# Altium PCB BYKC-6252-K20-C.PcbDoc
Units mm, origin at the board's own origin, x right, y up, seen from the top; angles counter-clockwise.
Board outline 75 x 26.5 mm, 2 copper layers (Top Layer, Bottom Layer); 62 components, 71 nets, 246 pads, 176 vias.
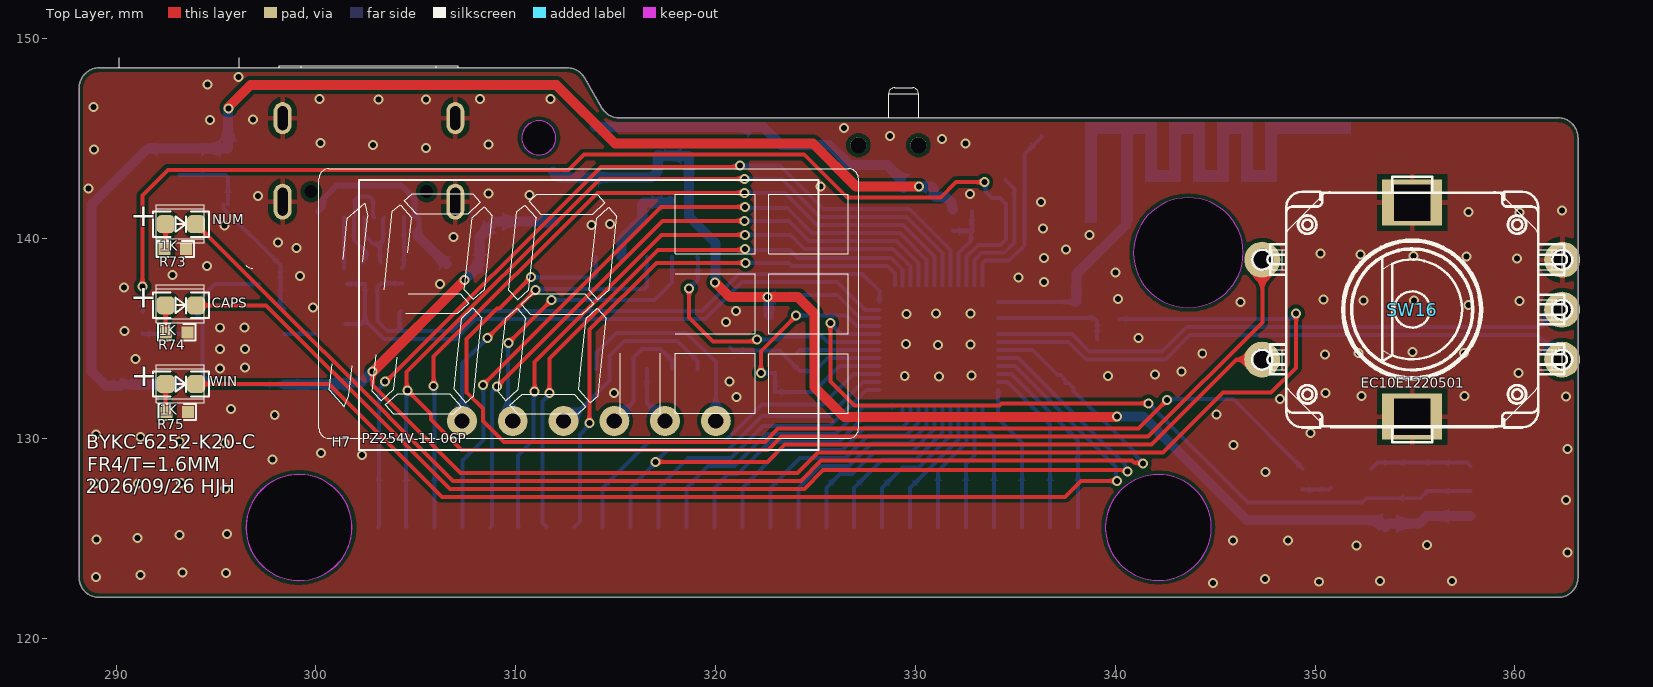
[diagram p0: Top Layer view]
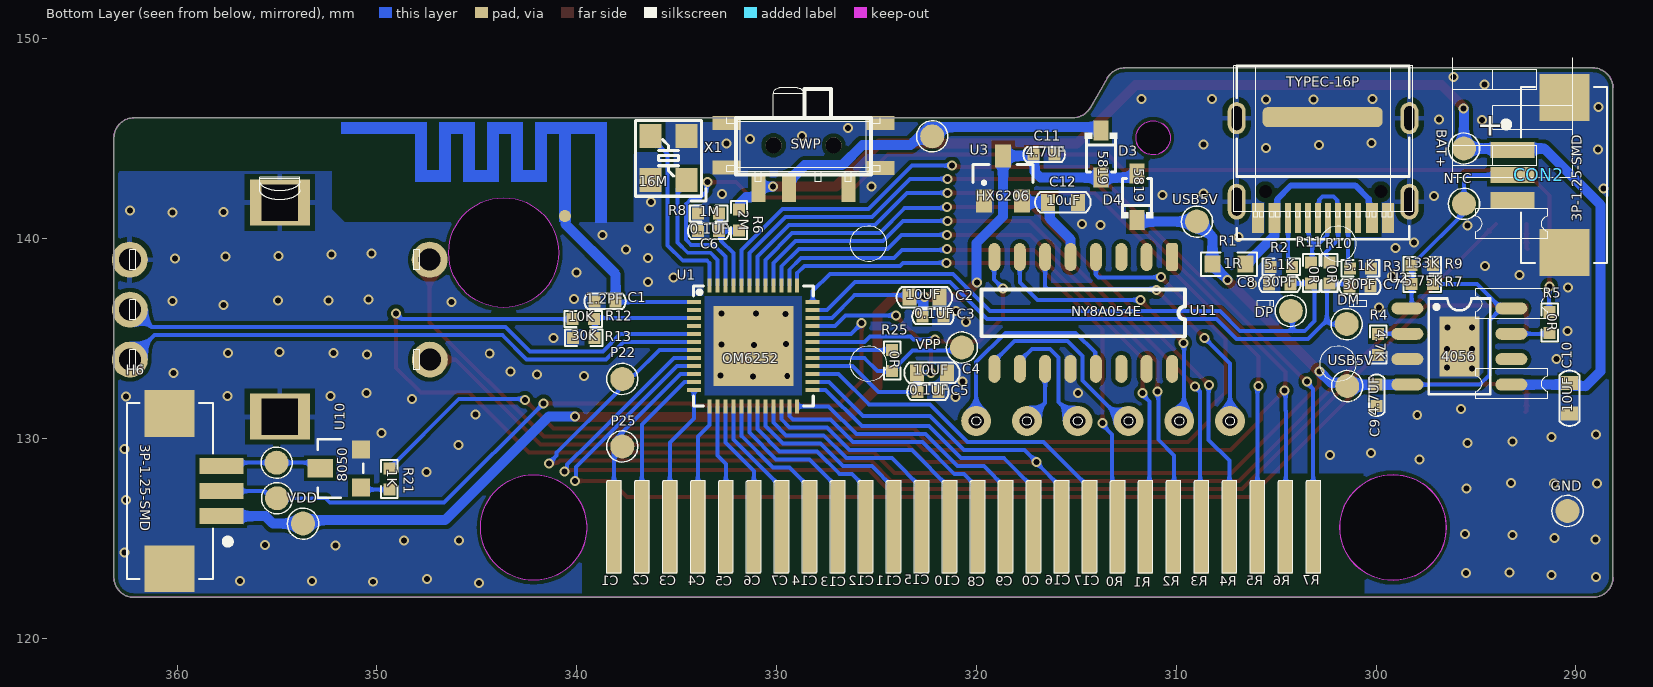
[diagram p1: Bottom Layer view, seen from below]
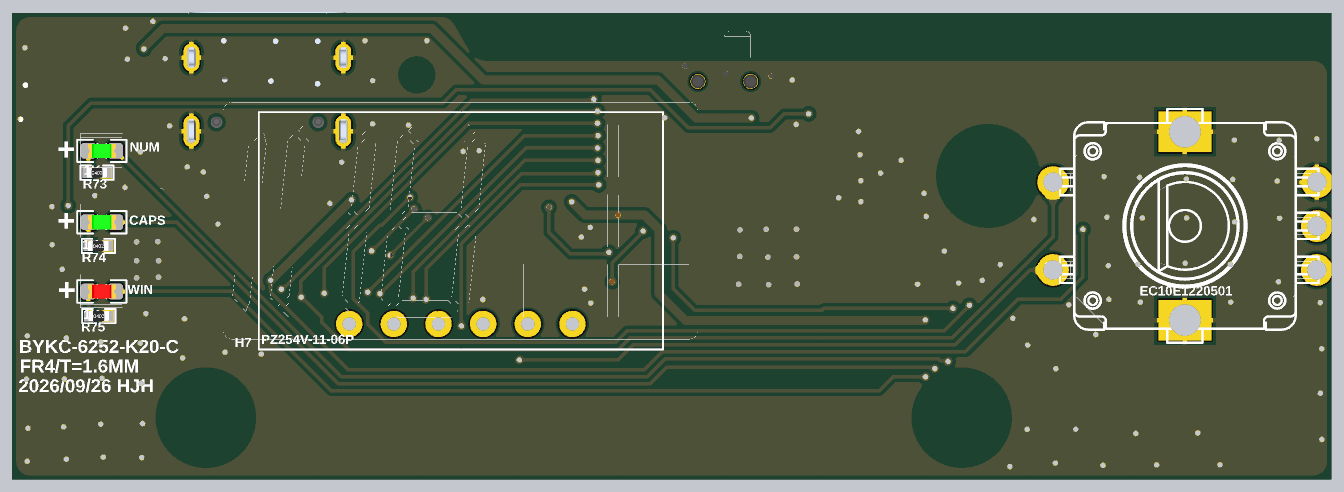
[diagram p2: 3D render of the assembled board from above, using the file's embedded part models]
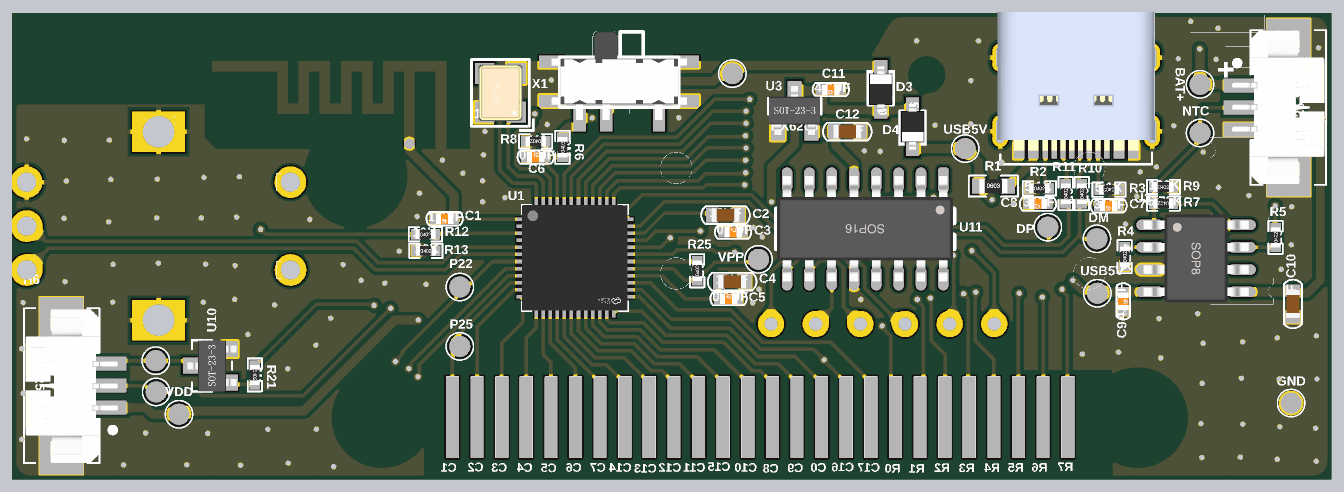
[diagram p3: 3D render of the assembled board from below, using the file's embedded part models]

## Layer stack, top to bottom
Top Solder: solder mask 0.0102, Solder Resist, Dk 3.5
Top Layer: signal copper 0.0356
Dielectric 1: dielectric 0.32, FR-4, Dk 4.8
Bottom Layer: signal copper 0.0356
Bottom Solder: solder mask 0.0102, Solder Resist, Dk 3.5

## Board outline
288.155,123.036 288.155,147.536 cw(c289.155,147.536) 289.155,148.536 312.578,148.536 cw(c312.578,147.536) 313.444,148.036 314.309,146.536 ccw(c315.175,147.036) 315.175,146.036 362.156,146.036 cw(c362.156,145.036) 363.156,145.036 363.155,123.036 cw(c362.155,123.036) 362.155,122.036 289.155,122.036 cw(c289.155,123.036)
cut-out: 296.498,125.536 ccw(c299.155,125.536) 299.155,122.88 ccw(c299.155,125.536) 301.034,123.658 ccw(c299.155,125.536) 301.812,125.536 ccw(c299.155,125.536) 299.155,128.193 ccw(c299.155,125.536) 297.276,127.415 ccw(c299.155,125.536)
cut-out: 339.505,125.536 ccw(c342.155,125.536) 342.155,122.886 ccw(c342.155,125.536) 344.805,125.536 ccw(c342.155,125.536) 342.155,128.186 ccw(c342.155,125.536)
cut-out: 340.905,139.286 ccw(c343.655,139.286) 343.655,136.536 ccw(c343.655,139.286) 346.405,139.286 ccw(c343.655,139.286) 343.655,142.036 ccw(c343.655,139.286)
cut-out: 310.298,145.036 ccw(c311.155,145.036) 311.155,144.179 ccw(c311.155,145.036) 312.012,145.036 ccw(c311.155,145.036) 311.155,145.893 ccw(c311.155,145.036)

## Design rules (kind name [scope] priority, off if disabled: settings)
Clearance [All] p1: gap=0.2 ignorepadtopadclearanceinfootprint=TRUE
ComponentClearance [All] p1: gap=0 collisioncheckmode=3 verticalgap=0 showdistances=FALSE
HoleToHoleClearance [All] p1: gap=0 allowstackedmicrovias=TRUE
MinimumSolderMaskSliver [All] p1: minsoldermaskwidth=0
PolygonConnect [All] p1: thpad.connectstyle=Relief thpad.reliefconductorwidth=0.254 thpad.reliefentries=4 thpad.polygonreliefangle="90 Angle" thpad.airgapwidth=0.254 smdpad.connectstyle=Direct smdpad.reliefconductorwidth=0.254 smdpad.reliefentries=4 smdpad.polygonreliefangle="90 Angle" smdpad.airgapwidth=0.254 via.connectstyle=Direct via.reliefconductorwidth=0.254 via.reliefentries=4 via.polygonreliefangle="90 Angle" via.airgapwidth=0.254
RoutingVias [All] p1: holewidth=0.3 width=0.5 viastyle="Through Hole" minholewidth=0.3 minwidth=0.5 maxholewidth=0.5 maxwidth=0.7
SilkToSilkClearance [All] p1: silktosilkclearance=0
SilkToSolderMaskClearance [IsPad] p1: minsilkscreentomaskgap=0 clearancetoexposedcopper=TRUE
SolderMaskExpansion [All] p1: expansion=0.102 istentingtop=FALSE
Width [All] p1: maxlimit=0.5 minlimit=0.2 preferedwidth=0.2
25 further rules are at their usual default settings.

## Classes and differential pairs
component class k20-b-2-3: C1 C2 C3 C4 C5 C6 C7 C8 C9 C10 C11 C12 CAPS CON2 D3 D4 H6 H7 NUM R1 R2 R3 R4 R5 R6 R7 R8 R9 R10 R11 R12 R13 R21 R25 R73 R74 R75 SW16 SWP

## Components (designator, comment, footprint, x,y, rotation, side; value= is the part's Value field where it differs from the comment)
BAT+ "" TEST 295.605,144.501 r90 bottom (schematic designator VPP)
C1 "1.2PF" C0402 338.582,136.855 r0 bottom
C2 "10UF" C0603 322.601,137.058 r0 bottom
C3 "0.1UF" C0402 322.174,136.093 r180 bottom
C4 "10UF" C0603 322.224,133.274 r0 bottom
C5 "0.1UF" C0402 322.428,132.309 r180 bottom
C6 "0.1UF" C0402 333.4,140.36 r180 bottom
C7 "30PF" C0402 300.812,137.592 r0 bottom
C8 "30PF" C0402 304.825,137.693 r0 bottom
C9 "4.7UF" C0402 299.974,132.153 r270 bottom
C10 "10UF" C0603 290.322,132.004 r90 bottom
C11 "4.7UF" C0402 316.611,144.196 r0 bottom
C12 "10uF" C0603 315.671,141.808 r0 bottom
CAPS "" LED_0603G 293.243,136.652 r0 top
CON2 "3P-1.25-SMD" 3P_1.25W_SMD 293.167,144.43 r90 bottom
D3 "5819" SOD-323(5819) 313.766,144.221 r270 bottom
D4 "5819" SOD-323(5819) 311.963,142.088 r90 bottom
DM "" TEST 301.473,135.712 r180 bottom
DP "" TEST 304.267,136.373 r180 bottom
GND "" TEST 290.424,126.365 r90 bottom
H6 "3P-1.25-SMD" 3P_1.25W_SMD 357.784,126.106 r270 bottom
H7 "PZ254V-11-06P" SMG-6P 313.407,133.819 r0 top locked
NTC "" TEST 295.605,141.732 r90 bottom (schematic designator VPP)
NUM "" LED_0603G 293.243,140.716 r0 top
P22 "" TEST 337.718,132.969 r90 bottom
P25 "" TEST 337.718,129.591 r90 bottom
R1 "1R" R0603 307.365,138.709 r180 bottom
R2 "5.1K" R0402 304.749,138.582 r180 bottom
R3 "5.1K" R0402 300.787,138.506 r0 bottom
R4 "4.7K" R0402 299.898,134.696 r90 bottom
R5 "0R" R0402 291.313,135.792 r90 bottom
R6 "2M" R0402 331.876,140.919 r90 bottom
R7 "5.75K" R0402 297.688,137.719 r0 bottom value=5.76K
R8 "1M" R0402 333.4,141.249 r0 bottom
R9 "133K" R0402 297.688,138.659 r180 bottom
R10 "0R" R0402 302.336,138.278 r90 bottom
R11 "0R" R0402 303.251,138.278 r90 bottom
R12 "10K" R0402 339.674,135.966 r180 bottom
R13 "30K" R0402 339.649,135.026 r180 bottom
R21 "1K" R0402 349.377,127.965 r270 bottom
R25 "0R" R0402 324.212,133.89 r90 bottom
R73 "1K" R0402 292.964,139.471 r0 top
R74 "1K" R0402 293.04,135.306 r0 top
R75 "1K" R0402 293.065,131.318 r0 top
SW16 "EC10E1220501" EC11 354.856,136.437 r90 top locked
SWP "" SW_SMD_7 328.65,144.661 r0 bottom locked
TYPEC-16P "Comment" TYPE_C_16 298.337,141.84 r180 bottom
U1 "OM6252" QFN48_6*6 331.165,134.62 r180 bottom
U2 "4056" SOP_8_D 295.834,134.595 r180 bottom
U3 "HX6206" SOT_23 318.668,143.002 r180 bottom
U10 "8050" SOT_23_NPN 351.815,128.486 r90 bottom
U11 "NY8A054E" SOP16 314.655,136.271 r270 bottom locked
USB5V "" TEST 301.447,132.613 r90 bottom (schematic designator VPP)
USB5V "" TEST 308.966,140.843 r90 bottom (schematic designator VPP)
VDD "" TEST 353.695,125.73 r90 bottom (schematic designator VBAT)
VPP "" TEST 322.212,145.109 r90 bottom
VPP "" TEST 354.99,127 r90 bottom
VPP "" TEST 355.016,128.778 r90 bottom
VPP "" TEST 320.726,134.544 r90 bottom
WIN "" LED_0603R 293.243,132.715 r0 top
X1 "16M" CRYSTAL-SMD3225-4P 335.407,144.018 r90 bottom
? "" ANT_F_S 340.589,141.122 r90 bottom

## Footprints (in the part's own frame and the unit in brackets; to place one, negate y for a bottom-side part, rotate by r counter-clockwise, add the part's x,y. Pads: shape width x height; smd on the part's side, far side on the other; paste and mask are expansions set on the pad)
3P_1.25W_SMD [mm]
  rect 0.8x2.2 smd paste+0 mask+0.05: 1(0,0) 2(-1.25,0) 3(-2.5,0)
  rect 2.35x2.5 smd paste+0 mask+0.05: 4(-5.134,-2.6) 5(2.634,-2.6)
  silkscreen extent -5.65,-4.73 3.15,0.48, body extent -5.6,-4.63 3.15,0.62, height 5
ANT_F_S [mm]
  round 0.6 smd: 1(0,0)
  Top Layer region: 4.7,11.212 4.7,6.9 4.1,6.9 4.1,11.212
  Top Layer region: 4.699,6.9 1.699,6.9 1.699,7.5 4.699,7.5
  Top Layer region: 1.7,5.701 1.7,7.192 2.299,7.192 2.299,5.701
  Top Layer region: 4.7,6.301 4.7,4.801 4.1,4.801 4.1,6.301
  Top Layer region: 1.7,6.299 4.7,6.299 4.7,5.699 1.7,5.699
  Top Layer region: 4.7,4.499 1.7,4.499 1.7,5.099 4.7,5.099
  Top Layer region: 1.7,3.609 1.7,5.101 2.299,5.101 2.299,3.609
  Top Layer region: 4.7,3.901 4.7,2.401 4.1,2.401 4.1,3.901
  Top Layer region: 1.7,1.5 4.7,1.5 4.7,0.9 1.7,0.9
  Top Layer region: -0.3,0.3 4.7,0.3 4.7,-0.3 -0.3,-0.3
  Top Layer region: 4.101,-1.715 4.101,-0.009 4.7,-0.009 4.7,-1.715
  Top Layer region: 4.7,-2.1 -0.362,-2.1 -0.362,-1.5 4.7,-1.5
  Top Layer region: 1.7,3.899 4.7,3.899 4.7,3.299 1.7,3.299
  Top Layer region: 4.7,2.1 1.7,2.1 1.7,2.7 4.7,2.7
  Top Layer region: 2.3,2.392 2.3,0.9 1.701,0.9 1.701,2.392
  Top Layer region: 4.7,1.499 4.7,-0.001 4.1,-0.001 4.1,1.499
C0402 [mm]
  rect 0.6x0.6 smd mask+0.03: 1(-0.53,0) 2(0.53,0)
  silkscreen extent -1.04,-0.38 1.04,0.38, body extent -0.5,-0.3 0.5,0.3, height 0.2
C0603 [mm]
  rect 0.7x0.85 smd paste+0 mask+0.051: 1(0.753,0) 2(-0.753,0)
  silkscreen extent -1.39,-0.51 1.39,0.51, body extent -0.8,-0.4 0.8,0.4, height 0.8
CRYSTAL-SMD3225-4P [mm]
  rect 1.2x1.1 smd: 0(-1.1,0.9) 0(1.1,-0.9) 1(1.1,0.9) 2(-1.1,-0.9)
  silkscreen extent -2.14,-1.87 1.89,1.64, body extent -1.6,-1.25 1.6,1.25, height 0.7
EC11 [mm]
  round 1.8 hole 1.1: 1(-2.499,-7.501) 2(-0.002,-7.501) 3(2.499,-7.508) 4(2.499,7.501) 5(-2.499,7.508)
  rect 2.3x3 hole 1.8 square: 6(5.36,0) 7(-5.35,0)
  silkscreen extent -6.64,-8.01 6.66,8.01
LED_0603G [mm]
  rrect50% 0.9x0.9 smd: 1(-0.762,0) 2(0.762,0)
  silkscreen extent -1.4,-0.64 1.4,0.64, body extent -0.8,-0.4 0.8,0.4, height 0.8
LED_0603R [mm]
  rrect50% 0.9x0.9 smd: 1(-0.762,0) 2(0.762,0)
  silkscreen extent -1.4,-0.64 1.4,0.64, body extent -0.8,-0.4 0.8,0.4, height 0.8
QFN48_6*6 [mm]
  rect 0.7x0.2 smd: 1(-2.975,2.2) 2(-2.975,1.8) 3(-2.975,1.4) 4(-2.975,1) 5(-2.975,0.6) 6(-2.975,0.2) 7(-2.975,-0.2) 8(-2.975,-0.6) 9(-2.975,-1) 10(-2.975,-1.4) 11(-2.975,-1.8) 12(-2.975,-2.2) 25(2.975,-2.2) 26(2.975,-1.8) 27(2.975,-1.4) 28(2.975,-1) 29(2.975,-0.6) 30(2.975,-0.2) 31(2.975,0.2) 32(2.975,0.6) 33(2.975,1) 34(2.975,1.4) 35(2.975,1.8) 36(2.975,2.2)
  rect 0.2x0.7 smd: 13(-2.2,-3.025) 14(-1.8,-3.025) 15(-1.4,-3.025) 16(-1,-3.025) 17(-0.6,-3.025) 18(-0.2,-3.025) 19(0.2,-3.025) 20(0.6,-3.025) 21(1,-3.025) 22(1.4,-3.025) 23(1.8,-3.025) 24(2.2,-3.025) 37(2.2,3.025) 38(1.8,3.025) 39(1.4,3.025) 40(1,3.025) 41(0.6,3.025) 42(0.2,3.025) 43(-0.2,3.025) 44(-0.6,3.025) 45(-1,3.025) 46(-1.4,3.025) 47(-1.8,3.025) 48(-2.2,3.025)
  rect 4x4 smd: 49(0,0)
  silkscreen extent -3,-3 3,3, body extent -3,-3 3,3, height 0.5
R0402 [mm]
  rect 0.6x0.6 smd mask+0.03: 1(-0.53,0) 2(0.53,0)
  silkscreen extent -0.94,-0.41 0.94,0.41, body extent -0.57,-0.28 0.57,0.28, height 0.41
R0603 [mm]
  rect 0.8x0.85 smd: 1(-0.825,0) 2(0.825,0)
  silkscreen extent -1.4,-0.6 1.4,0.6, body extent -0.8,-0.41 0.8,0.41, height 0.45
SMG-6P [mm]
  round 1.5 hole 0.762: 1(6.605,-2.953) 2(4.065,-2.953) 3(1.525,-2.953) 4(-1.015,-2.953) 5(-3.555,-2.953) 6(-6.095,-2.953)
  silkscreen extent -11.25,-4.4 11.75,9.1
SOD-323(5819) [mm]
  rect 1x0.75 smd: 1(1.173,0) 2(-1.173,0)
  silkscreen extent -1.08,-0.8 0.9,0.8, body extent -1.3,-0.67 1.3,0.67, height 1.1
SOP16 [mm]
  rrect50% 1.4x0.6 smd: 1(-2.8,4.445)
  oval 1.4x0.6 smd: 2(-2.8,3.175) 3(-2.8,1.905) 4(-2.8,0.635) 5(-2.8,-0.635) 6(-2.8,-1.905) 7(-2.8,-3.175) 8(-2.8,-4.445) 9(2.8,-4.445) 10(2.8,-3.175) 11(2.8,-1.905) 12(2.8,-0.635) 13(2.8,0.635) 14(2.8,1.905) 15(2.8,3.175) 16(2.8,4.445)
  silkscreen extent -1.16,-5.08 1.16,5.08, body extent -3.01,-5.01 2.99,4.99, height 1.9
SOP_8_D [mm]
  rect 2x3 smd: 0(0,0)
  oval 1.6x0.6 smd: 1(-2.6,1.905) 2(-2.6,0.635) 3(-2.6,-0.635) 4(-2.6,-1.905) 5(2.6,-1.905) 6(2.6,-0.635) 7(2.6,0.635) 8(2.6,1.905)
  silkscreen extent -1.53,-2.4 1.54,2.4, body extent -3,-2.5 3,2.5, height 1.9
SOT_23 [mm]
  rect 0.8x1.15 smd: 1(-0.95,-1.125) 2(0.95,-1.125) 3(0,1.125)
  silkscreen extent -1.5,-0.3 1.5,0.7, body extent -1.45,-1.4 1.45,1.4, height 1.2
SOT_23_NPN [mil]
  rect 36x36 smd: 1(-37.5,-40) 2(37.5,-40)
  rect 36x50 smd: 3(0.5,40)
  silkscreen extent -57,-45 57,45, body extent -57,-55 57,55, height 47
SW_SMD_7 [mm]
  rect 1.4x0.7 smd: 0(-3.84,1.125) 0(-3.84,-1.125) 0(3.85,1.12) 0(3.86,-1.125)
  rect 0.7x1.4 smd: 1(2.25,2.145) 2(0.74,2.145) 3(-2.26,2.145)
  round 0.8 hole 0.8: ""(-1.5,0) ""(1.5,0)
  silkscreen extent -3.38,-2.81 3.39,1.46, body extent -3.85,-2.8 3.85,2.2, height 1.16
TEST [mm]
  round 1.2 smd: 1(0,0)
  silkscreen extent -0.78,-0.78 0.78,0.78
TYPE_C_16 [mm] "TYPE-C 16PIN 2MD"
  round 0.025 hole 0.65 unplated: 5(-1.43,0.5) 6(-7.21,0.5)
  rect 0.6x1.5 smd: A1/B12(-1.067,-0.824) A4/B9(-1.88,-0.824) B1/A12(-7.569,-0.824) B4/A9(-6.756,-0.824)
  rect 0.3x1.5 smd: A5(-3.07,-0.824) A6(-4.07,-0.824) A7(-4.57,-0.824) A8(-5.57,-0.824) B5(-6.07,-0.824) B6(-5.07,-0.824) B7(-3.57,-0.824) B8(-2.57,-0.824)
  oval 0.9x1.6 hole 0.5 slot 1.2 at 90 deg: G(-8.64,4.18) G(0,4.18)
  oval 0.9x1.8 hole 0.5 slot 1.4 at 90 deg: G(-8.64,0) G(0,0)
  rrect50% 6x1 smd: G(-4.343,4.231)
  silkscreen extent -8.64,-1.89 0,6.8, body extent -8.79,-1.12 0.15,6.78, height 3.11

## Part data
BAT+ DM DP GND NTC P22 P25 USB5V USB5V VDD VPP VPP VPP VPP: library part TEST_POINT
C1 C2 C3 C4 C5 C6 C7 C8 C9 C10 C11: library part Cap, "Capacitor", LatestRevisionDate=17-Jul-2002, LatestRevisionNote="Re-released for DXP Platform.", PackageDescription="Radial Cap, Thru-Hole; 2 Leads; 0.3 in Pin Spacing", PackageReference=RAD-0.3, Published=8-Jun-2000, Publisher="Altium Limited"
C12: library part CAPACITOR, "Capacitor"
CAPS NUM WIN: library part LED_0603-R, Add into BOM=yes, Convert to PCB=yes, Device=LED_0603-R, Supplier Footprint=0603, Symbol=LED_R
CON2: library part 3P
D3 D4: library part D_1N4007A, Add into BOM=yes, Convert to PCB=yes, Device=D_1N4007A, Supplier Footprint=DO-41, Symbol=D_1N4007
H6: library part PZ254V-11-03P, Color=黑色, Current Rating (Max)=3A, JLCPCB Part Class="Extended Part", LCSC Part Name="间距:2.54mm 1x3P 直插 方针", Manufacturer=XFCN(兴飞), Operating Temperature Range=-40℃~+105℃, Voltage Rating (Max)=250V, Add into BOM=yes, Circluar Pins/Square Pins=方针, Convert to PCB=yes, Datasheet=https://atta.szlcsc.com/upload/public/pdf/source/20200309/C492402_8335C3D49C4E4C618838D59BB1D024C1.pdf, Device=PZ254V-11-03P, Insulation Height=2.5mm, Length of End Connection Pin=3mm, Length of Mating Pin=6mm, Manufacturer Part=PZ254V-11-03P, Mounting Type=直插, Number of Pins=3P, Number of Rows=单排, Pin Structure=1x3P, Pitch=2.54mm, Row Spacing=-, Supplier=LCSC, Supplier Footprint=插件,P=2.54mm, Supplier Part=C2937625, Symbol=PZ254V-11-03P_C2937625
H7: Color=黑色, Current Rating (Max)=-, JLCPCB Part Class="Extended Part", LCSC Part Name="间距:2.54mm 1x6P 直插 方针", Manufacturer=XFCN(兴飞), Operating Temperature Range=-40℃~+105℃, Add into BOM=yes, Circluar Pins/Square Pins=方针, Contact Material=黄铜, Contact Plating=-, Convert to PCB=yes, Datasheet=https://atta.szlcsc.com/upload/public/pdf/source/20200309/C492405_597F1930F5B55CC3C7FD95458F1C3977.pdf, Device=PZ254V-11-06P, Insulation Height=2.5mm, Length of End Connection Pin=3mm, Length of Mating Pin=6mm, Manufacturer Part=PZ254V-11-06P, Mounting Type=直插, Number of Pins=6P, Number of Rows=单排, Pin Structure=1x6P, Pitch=2.54mm, Row Spacing=-, Supplier=LCSC, Supplier Footprint=插件,P=2.54mm, Supplier Part=C492405, Symbol=PZ254V-11-06P, Voltage Rating (Max)=-
R1 R2 R3 R4 R5 R6 R7 R8 R9 R10 R11 R12 R13 R25: library part Res2, "Resistor", LatestRevisionDate=17-Jul-2002, LatestRevisionNote="Re-released for DXP Platform.", PackageDescription="Axial Device, Thru-Hole; 2 Leads; 0.4 in Pin Spacing", PackageReference=AXIAL-0.4, Published=8-Jun-2000, Publisher="Altium Limited"
R21 R73 R74 R75: library part Res_0603, Add into BOM=yes, Convert to PCB=yes, Device=Res_0603, Supplier Footprint=0603, Symbol=电阻
SW16: JLCPCB Part Class="Extended Part", Manufacturer=ALPSALPINE(阿尔卑斯阿尔派), Add into BOM=yes, Convert to PCB=yes, Datasheet=https://atta.szlcsc.com/upload/public/pdf/source/20180227/C160889_15197014267581370273.pdf, Device=EC10E1220501, LCSC Part Name=EC10E1220501, Manufacturer Part=EC10E1220501, Supplier=LCSC, Supplier Footprint=插件, Supplier Part=C160889, Symbol=EC10E1220501
SWP: library part SW-SPST, "Single-Pole, Single-Throw Switch", LatestRevisionDate=17-Jul-2002, LatestRevisionNote="Re-released for DXP Platform.", PackageDescription="Switch; 2 Leads", PackageReference=SPST-2, Published=24-Mar-1999, Publisher="Altium Limited"
U1: library part QFN48-BYC6625
U2: library part "4057 SOP-8"
U3: library part BL8530
U10: library part SI2301-ZE, Continuous Drain Current (Id)=2.3A, Drain Source On Resistance (RDS(on)@Vgs,Id)=126mΩ@4.5V, Drain Source Voltage (Vdss)=20V, Gate Threshold Voltage (Vgs(th)@Id)=1V@250uA, Input Capacitance (Ciss@Vds)=285pF, JLCPCB Part Class="Extended Part", LCSC Part Name="1个P沟道 耐压:20V 电流:2.3A", Manufacturer="HXY MOSFET(华轩阳电子)", Manufacturer Part=SI2300-ZE, Power Dissipation (Pd)=700mW, Add into BOM=yes, Convert to PCB=yes, Datasheet=https://atta.szlcsc.com/upload/public/pdf/source/20230515/2FF2907841563ED329594D3237822724.pdf, Device=SI2301-ZE, Supplier=LCSC, Supplier Footprint=SOT-23, Supplier Part=C5261052, Symbol=SI2301-ZE, Type=1个P沟道
U11: library part NY8A054E_C5143691, JLCPCB Part Class="Extended Part", Manufacturer=九齐, Add into BOM=yes, Convert to PCB=yes, Datasheet=https://atta.szlcsc.com/upload/public/pdf/source/20220901/9859F0BC82D614E1FA05D663ED00CF5E.pdf, Device=NY8A054E_C5143691, LCSC Part Name=NY8A054E, Manufacturer Part=NY8A054E, Supplier=LCSC, Supplier Footprint=SOP-16, Supplier Part=C5143691, Symbol=NY8A054E_C5143691
X1: library part XTAL, "Crystal Oscillator", LatestRevisionDate=17-Jul-2002, LatestRevisionNote="Re-released for DXP Platform.", PackageDescription="Crystal, Thru-Hole; 2 Leads; Body 3.1 x 8.2 mm (Dia.xH)", PackageReference=R38, Published=8-Jun-2000, Publisher="Altium Limited"
?: library part Antenna, "Generic Antenna", LatestRevisionDate=17-Jul-2002, LatestRevisionNote="Re-released for DXP Platform.", PackageReference=PIN1, Published=24-Mar-1999, Publisher="Altium Limited"

## Free pads (board coordinates)
  rect 0.74x4.65 smd far side: 26(303.138,125.566) 27(304.538,125.566) 28(305.938,125.566) 29(307.338,125.566) 30(308.738,125.566) 31(310.138,125.566) 32(311.538,125.566) 33(312.938,125.566) 34(314.338,125.566) 35(315.738,125.566) 36(317.138,125.566) 37(318.538,125.566) 38(319.938,125.566) 39(321.338,125.566) 40(322.738,125.566) 41(324.138,125.566) 42(325.538,125.566) 43(326.938,125.566) 44(328.338,125.566) 45(329.738,125.566) 46(331.138,125.566) 47(332.538,125.566) 48(333.938,125.566) 49(335.338,125.566) 50(336.738,125.566) 51(338.138,125.566)

## Via types
v1: diameter 0.5, hole 0.3, Top Layer to Bottom Layer, tented both sides, 176 vias

## Nets (pads, with @x,y where several pads share a name; then routed paths per layer and width w, separated by ;. In a path a pad name is that pad's centre, name@x,y a point inside that pad or via, vN(x,y) a via of type N, cw(c..) or ccw(c..) an arc to the next point about the centre after c; other vN are vias at no path point)
54E_CTRL: U1.31 U11.8 | length 13.4
  Top Layer w0.2: v1(318.676,137.502) 318.676,136.054 319.881,134.849 321.905,134.849 322,134.943 v1(322.081,134.943)
  Bottom Layer w0.2: v1(318.676,137.502) 319.113,137.94 319.113,139.058 U11.8 ; v1(322.081,134.943) 323.143,134.943 323.293,135.093 325.333,135.093 325.606,134.82 U1.31
BAT+: BAT+.1 C10.1 CON2.1 R6.2 SWP.1 U2.5 | length 62.9
  Top Layer w0.5: v1(295.631,146.507) 295.631,146.582 296.724,147.676 312.03,147.676 314.962,144.744 324.877,144.744 327.034,142.587 v1(330.19,142.587)
  Bottom Layer w0.5: U2.5 290.39,132.69 C10.1 290.178,132.613 289.509,132.613 288.773,133.35 288.773,141.681 291.592,144.501 293.167,144.501 BAT+.1 295.605,146.482 v1(295.631,146.507) ; v1(330.19,142.587) 330.83,142.587 SWP.1 330.9,142.166 331,142.066 331.533,142.066 331.826,141.774 331.826,141.499 R6.2
C0: pad.36 U1.25 | length 15
  Bottom Layer w0.2: pad.36 317.138,127.521 318.632,129.016 320.778,129.016 322.375,130.613 325.733,130.613 327.54,132.42 U1.25
C1: P25.1 pad.51 U1.10 | length 9.7
  Bottom Layer w0.2: U1.10 334.812,133.22 338.138,129.894 pad.51
C2: pad.50 U1.11 | length 8.6
  Bottom Layer w0.2: U1.11 334.614,132.82 336.738,130.697 pad.50
C3: pad.49 U1.12 | length 7.3
  Bottom Layer w0.2: U1.12 334.14,130.985 335.338,129.787 pad.49
C4: pad.48 U1.13 | length 6.3
  Bottom Layer w0.2: U1.13 333.365,130.667 333.938,130.095 pad.48
C5: pad.47 U1.14 | length 6.2
  Bottom Layer w0.2: pad.47 332.538,128.703 332.965,129.13 U1.14
C6: pad.46 U1.15 | length 6.6
  Bottom Layer w0.2: pad.46 331.138,128.356 332.565,129.783 U1.15
C7: pad.45 U1.16 | length 7
  Bottom Layer w0.2: pad.45 329.738,127.521 332.165,129.949 U1.16
C8: pad.38 U1.23 | length 13.3
  Bottom Layer w0.2: pad.38 319.938,127.521 320.632,128.216 321.109,128.216 322.707,129.813 326.176,129.813 327.308,130.945 329.189,130.945 329.365,131.121 U1.23
C9: pad.37 U1.24 | length 14.1
  Bottom Layer w0.2: pad.37 318.538,127.521 319.632,128.616 320.943,128.616 322.541,130.213 326.01,130.213 327.392,131.595 U1.24
C10: pad.39 U1.22 | length 12.4
  Bottom Layer w0.2: pad.39 321.338,127.521 323.23,129.413 326.342,129.413 327.473,130.545 329.355,130.545 329.765,130.955 U1.22
C11: pad.41 U1.20 | length 10.6
  Bottom Layer w0.2: pad.41 324.138,127.521 325.23,128.613 326.673,128.613 327.805,129.745 329.687,129.745 330.565,130.624 330.565,131.121 U1.20
C12: pad.42 U1.19 | length 9.7
  Bottom Layer w0.2: pad.42 325.538,127.521 326.23,128.213 326.839,128.213 327.97,129.345 329.852,129.345 330.965,130.458 U1.19
C13: pad.43 U1.18 | length 8.8
  Bottom Layer w0.2: pad.43 326.938,127.521 328.361,128.945 330.018,128.945 331.365,130.292 U1.18
C14: pad.44 U1.17 | length 7.9
  Bottom Layer w0.2: pad.44 328.338,127.521 329.361,128.545 330.184,128.545 331.765,130.127 U1.17
C15: pad.40 U1.21 | length 11.5
  Bottom Layer w0.2: pad.40 322.738,127.521 324.23,129.013 326.507,129.013 327.639,130.145 329.521,130.145 330.165,130.789 330.165,131.486 U1.21
C16: pad.35 SW16.5 U1.26 | length 49.1
  Top Layer w0.2: v1(316.992,128.824) 322.605,128.824 323.461,129.68 341.802,129.68 346.06,133.938 SW16.5
  Bottom Layer w0.2: pad.35 315.738,127.521 316.992,128.776 v1(316.992,128.824) ; v1@316.992,128.803 v1(316.992,128.824) ; U1.26 327.375,132.82 325.679,131.124 322.321,131.124 320.612,129.416 317.584,129.416 v1(316.992,128.824)
C17: pad.34 U1.27 | length 18.2
  Bottom Layer w0.2: pad.34 314.338,127.521 316.632,129.816 320.446,129.816 321.327,130.697 322.314,131.683 325.363,131.683 326.9,133.22 U1.27
CHR_OK: R5.2 U1.46 | length 57.4
  Top Layer w0.2: v1@291.327,137.603 291.327,142.153 292.608,143.434 312.649,143.434 313.408,144.194 324.436,144.194 326.593,142.037 331.256,142.037 332.037,142.818 v1(333.451,142.818)
  Bottom Layer w0.2: R5.2 291.338,136.347 v1@291.338,137.592 ; U1.46 332.565,138.295 332.565,139.098 333.151,139.684 334.278,139.684 334.543,139.949 334.543,141.711 334.237,142.018 333.833,142.018 333.509,142.342 333.509,142.761 v1(333.451,142.818)
  other v1: 291.327,137.595
D+: R11.2 TYPEC-16P.A6 TYPEC-16P.B6 | length 4.2
  Bottom Layer w0.2: TYPEC-16P.A6@302.407,141.056 302.457,141.006 302.457,140.142 302.873,139.725 303.2,139.725 ; R11.2 303.2,138.858 303.2,139.725 ; TYPEC-16P.B6@303.407,141.056 303.357,141.006 303.357,139.882 303.2,139.725
D-: R10.2 TYPEC-16P.A7 TYPEC-16P.B7 | length 5.4
  Bottom Layer w0.2: R10.2 302.514,138.985 302.514,139.319 301.907,139.926 301.907,141.056 301.957,141.106 301.957,141.93 302.132,142.106 302.681,142.106 302.857,141.93 302.857,141.106 TYPEC-16P.A7@302.907,141.056
DM: C7.2 DM.1 R10.1 U1.35 | length 31.7
  Bottom Layer w0.2: DM.1 302.267,135.712 302.463,135.908 ; C7.2@301.549,137.722 302.463,137.722 302.463,135.908 ; U1.35 327.486,136.42 326.085,137.82 321.33,137.82 319.48,135.97 307.988,135.97 306.975,134.957 303.415,134.957 302.463,135.908
DP: C8.1 DP.1 R11.1 U1.36 | length 31.4
  Bottom Layer w0.2: R11.1 303.073,137.57 303.073,135.865 303.581,135.357 304.19,135.357 ; R11.1@303.403,137.748 C8.1@304.343,137.748 ; DP.1 304.19,136.296 304.19,135.357 ; U1.36 328.19,137.366 327.33,138.227 323.665,138.227 323.662,138.23 321.174,138.23 319.314,136.37 307.823,136.37 306.809,135.357 304.19,135.357
GND: C1.2 C2.2 C3.2 C4.2 C5.2 C6.1 C7.1 C8.2 C9.2 C10.2 C11.1 C12.2 CON2.3 CON2.4 CON2.5 GND.1 H6.4 H6.5 R2.1 R3.1 R4.1 R8.2 R9.2 R13.1 R73.2 R74.2 R75.2 SW16.3 SW16.6 SW16.7 SWP.0 TYPEC-16P.A1/B12 TYPEC-16P.B1/A12 TYPEC-16P.G U1.49 U2.0 U2.3 U3.1 U10.2 U11.12 X1.0
  other v1: 344.896,122.752 350.193,122.822 353.245,122.848 356.85,122.848 347.483,122.953 288.994,123.054 291.219,123.169 295.504,123.266 293.319,123.292 362.638,124.295 352.061,124.637 355.587,124.664 345.878,124.874 348.641,124.874 289.032,124.934 291.066,125.011 293.176,125.165 295.555,125.203 362.56,126.924 295.478,127.483 288.955,127.735 291.104,127.735 293.253,127.774 347.509,128.321 297.84,128.93 302.308,129.155 300.245,129.262 362.638,129.452 345.904,129.663 295.427,129.769 293.176,129.846 291.219,130.076 288.994,130.191 349.772,130.268 297.942,131.166 345.065,131.19 295.747,131.457 348.252,131.955 321.056,132.055 362.559,132.084 352.315,132.108 357.462,132.108 314.909,132.258 350.525,132.264 320.699,132.834 331.172,133.103 329.465,133.123 339.642,133.12 332.797,133.143 341.981,133.193 360.169,133.271 343.326,133.346 295.213,133.485 296.464,133.53 290.985,133.974 350.503,134.189 344.352,134.241 352.181,134.256 357.439,134.256 354.866,134.323 295.213,134.463 296.464,134.463 331.131,134.668 329.526,134.708 332.757,134.688 341.165,135.01 290.413,135.371 295.213,135.531 296.418,135.554 320.523,135.814 329.546,136.214 331.031,136.254 332.757,136.254 321.031,136.358 299.847,136.55 357.686,136.672 346.257,136.811 360.236,136.874 352.427,136.896 354.956,136.896 350.413,136.941 340.143,136.981 290.398,137.541 306.216,137.721 336.423,137.82 335.153,138.049 299.201,138.127 292.831,138.172 340.01,138.293 294.557,138.632 360.102,139 336.423,139.014 357.574,139.089 354.933,139.111 352.27,139.201 350.257,139.246 337.541,139.446 299.018,139.513 298.094,139.802 306.885,140.067 338.706,140.184 336.372,140.487 295.433,140.649 313.792,140.68 314.705,140.723 360.214,141.304 357.663,141.327 362.362,141.394 336.286,141.817 297.096,142.135 310.686,142.179 332.74,142.215 308.644,142.249 288.612,142.51 325.257,142.595 288.894,144.451 305.516,144.529 302.858,144.687 308.645,144.708 300.227,144.766 332.51,144.747 331.332,144.971 328.734,145.132 326.434,145.531 294.691,145.923 296.843,145.957 288.867,146.575 300.176,146.976 303.126,146.953 305.521,146.953 308.211,146.976 311.734,146.976 294.587,147.693 296.138,148.079
LED_0: H7.6 U11.6 | length 15.2
  Top Layer w0.2: v1(308.585,135.026) 308.598,135.026 310.984,137.413 v1(310.997,137.413)
  Bottom Layer w0.2: H7.6 307.311,133.753 v1(308.585,135.026) ; v1(310.997,137.413) 311.054,137.47 316.443,137.47 316.56,137.587 U11.6
LED_1: H7.5 U11.7 | length 14.7
  Top Layer w0.2: v1(309.645,134.775) 311.785,136.915 v1(311.785,136.92)
  Bottom Layer w0.2: v1@309.61,134.763 309.61,131.107 H7.5 ; v1(311.785,136.92) 316.955,136.92 317.83,137.795 U11.7
LED_2: H7.4 U11.9 | length 9.9
  Bottom Layer w0.2: H7.4 312.663,130.866 314.69,132.892 314.69,134.12 315.442,134.871 318.1,134.871 319.1,133.871 U11.9
LED_3: H7.3 U11.10 | length 6.4
  Bottom Layer w0.2: H7.3 315.89,131.825 315.89,134.05 316.312,134.471 317.23,134.471 317.748,133.953 317.83,133.953 U11.10
LED_4: H7.2 U11.11 | length 3
  Bottom Layer w0.2: U11.11 316.56,131.777 H7.2
LED_5: H7.1 U11.13 | length 10.7
  Bottom Layer w0.2: U11.13 314.05,133.501 314.05,134.289 315.032,135.271 318.549,135.271 320.011,133.808 H7.1
Net_1: ?.1 C1.1 U1.1 | length 9.2
  Bottom Layer w0.2: U1.1 C1.1@338.017,136.82
  Bottom Layer w0.5: C1.1@338.017,136.82 C1.1 338.052,138.205 340.569,140.722 340.569,141.103 ?.1
NetC6_2: C6.2 R6.1 R8.1 U1.45 | length 5.9
  Bottom Layer w0.2: R6.1 332.836,140.389 332.779,140.332 332.779,139.878 332.165,139.264 332.165,138.461 U1.45 ; R6.1@331.905,140.36 C6.2 ; C6.2@332.82,140.36 R8.1@332.82,141.351
NetCAPS_1: CAPS.1 R74.1 | length 1.4
  Top Layer w0.2: CAPS.1 292.481,135.335 R74.1
NetD3_2: D3.2 SWP.2 VPP.1@322.212,145.109 | length 16.9
  Bottom Layer w0.5: D3.2@313.969,145.567 322.402,145.567 323.291,144.678 325.702,144.678 326.714,143.666 328.59,143.666 329.29,142.966 329.29,142.616 SWP.2
NetH6_3: H6.3 U10.3 VPP.1@355.016,128.778 | length 5.1
  Bottom Layer w0.2: U10.3 353.111,128.778 355.016,128.778 357.612,128.778 H6.3
NetNUM_1: NUM.1 R73.1 | length 1.3
  Top Layer w0.2: R73.1 292.481,139.519 NUM.1
NetR1_2: R1.2 TYPEC-16P.A4/B9 TYPEC-16P.B4/A9 | length 9.9
  Bottom Layer w0.25: TYPEC-16P.B4/A9@305.097,140.325 305.172,140.4 TYPEC-16P.B4/A9@305.172,141.031
  Bottom Layer w0.3: TYPEC-16P.A4/B9@300.117,141.346 300.366,141.596 300.366,141.972 301.05,142.656 304.257,142.656 304.943,141.97 304.943,141.166 TYPEC-16P.B4/A9
  Bottom Layer w0.5: TYPEC-16P.B4/A9@305.097,140.325 305.097,140.12 306.332,138.884 306.39,138.884 306.54,138.734 R1.2
NetR2_2: R2.2 TYPEC-16P.B5 | length 2.6
  Bottom Layer w0.2: R2.2@304.321,138.532 304.407,138.617 TYPEC-16P.B5@304.407,141.056
NetR3_2: R3.2 TYPEC-16P.A5 | length 2.6
  Bottom Layer w0.2: R3.2@301.407,138.494 TYPEC-16P.A5@301.407,141.056
NetR4_2: R4.2 U2.2 | length 1.5
  Bottom Layer w0.2: U2.2 299.894,135.23 R4.2
NetR5_1: R5.1 U2.7 | length 1.9
  Bottom Layer w0.2: R5.1 291.345,135.23 U2.7
NetR12_2: R12.2 R13.2 U1.3 | length 5.9
  Bottom Layer w0.2: U1.3 338.938,136.02 339.093,135.865 339.093,134.976 R13.2@339.119,134.95
NetR21_2: R21.2 U10.1 | length 1.5
  Bottom Layer w0.2: R21.2 350.701,127.435 U10.1
NetR75_1: R75.1 WIN.1 | length 1.4
  Top Layer w0.2: WIN.1 292.481,131.372 R75.1
NetU1_47: U1.47 X1.2 | length 6.9
  Bottom Layer w0.2: U1.47 332.965,138.129 332.965,138.933 333.317,139.284 334.444,139.284 334.953,139.793 334.953,142.472 X1.2
NetU1_48: U1.48 X1.1 | length 9.4
  Bottom Layer w0.2: U1.48 333.365,138.767 333.482,138.884 334.693,138.884 335.457,139.648 335.457,144.218 336.307,145.068 X1.1
NetU11_12: 
NTC: CON2.2 NTC.1 R7.2 R9.1 U2.1 | length 10.3
  Bottom Layer w0.2: CON2.2 295.488,143.18 295.605,143.063 NTC.1 ; NTC.1@295.375,141.692 295.375,141.502 R9.1 R7.2 298.218,136.684 298.403,136.5 U2.1
P22: NUM.2 P22.1 U1.7 | length 63
  Top Layer w0.2: NUM.2 300.379,134.342 300.402,134.342 306.87,127.874 324.273,127.874 325.279,128.88 340.842,128.88 340.934,128.787 341.319,128.787 v1(341.376,128.73)
  Bottom Layer w0.2: U1.7 335.861,134.42 337.121,133.16 337.256,133.16 337.515,132.902 337.515,132.766 337.651,132.766 337.91,132.507 337.91,132.371 341.004,129.277 341.004,129.136 341.376,128.764 v1(341.376,128.73)
P23: CAPS.2 U1.8 | length 59.8
  Top Layer w0.2: CAPS.2 297.503,136.652 300.814,133.341 300.837,133.341 306.704,127.474 324.439,127.474 325.378,128.412 340.321,128.412 340.346,128.387 340.557,128.387 v1(340.614,128.33)
  Bottom Layer w0.2: U1.8 335.143,134.02 339.337,129.826 340.476,128.688 340.476,128.549 340.614,128.411 v1(340.614,128.33)
P24: U1.9 WIN.2 | length 57.5
  Top Layer w0.2: WIN.2 300.66,132.715 306.301,127.074 337.488,127.074 338.282,127.868 340.087,127.868 v1(340.094,127.861)
  Bottom Layer w0.2: U1.9 334.79,133.62 334.978,133.62 340.025,128.573 340.025,128.135 340.044,128.115 340.044,127.911 v1(340.094,127.861)
P32: R25.2 U1.30 | length 4.1
  Bottom Layer w0.2: R25.2@324.104,134.312 R25.2 U1.30
PWM: H6.2 U1.32 VPP.1@354.99,127 | length 40.4
  Top Layer w0.2: v1(325.744,135.766) 325.744,132.853 326.949,131.648 334.211,131.648 334.312,131.75 v1(341.655,131.75)
  Bottom Layer w0.2: v1@325.755,135.744 326.279,135.22 U1.32 ; v1(341.655,131.75) 346.629,126.776 352.357,126.776 352.581,127 354.99,127 355.261,127 355.617,127.356 H6.2
PWM_OFF: R21.1 U11.4 | length 57
  Top Layer w0.2: v1(310.769,138.074) 309.183,136.488 309.072,136.488 307.543,134.959 307.543,132.304 308.361,131.485 308.361,130.871 309.416,129.816 322.466,129.816 323.13,130.48 341.163,130.48 342.595,131.912 v1(342.595,131.928)
  Bottom Layer w0.2: v1(310.769,138.074) 310.791,138.052 313.903,138.052 314.02,138.169 U11.4 ; v1(342.595,131.928) 342.646,131.978 345.894,131.978 R21.1
R0: pad.33 U1.37 | length 27.7
  Top Layer w0.2: v1(313.69,130.759) 313.69,135.433 317.037,138.779 v1(321.506,138.78)
  Bottom Layer w0.2: pad.33 313.208,125.836 313.208,130.197 313.69,130.679 v1(313.69,130.759) ; v1(321.506,138.78) 323.678,138.779 323.831,138.627 328.606,138.627 328.965,138.268 U1.37
R1: pad.32 U1.38 | length 29.8
  Top Layer w0.2: v1(311.683,132.258) 311.683,133.992 317.113,139.421 321.405,139.421 v1(321.462,139.479)
  Bottom Layer w0.2: pad.32 311.341,125.763 311.341,131.835 311.683,132.177 v1(311.683,132.258) ; v1(321.462,139.479) 321.52,139.421 323.722,139.421 324.117,139.027 328.772,139.027 329.365,138.433 U1.38
R2: pad.31 U1.39 | length 31.7
  Top Layer w0.2: v1(310.947,132.334) 310.947,133.821 317.305,140.179 v1(321.462,140.179)
  Bottom Layer w0.2: pad.31 310.109,125.595 310.109,129.15 310.901,129.942 310.901,132.289 v1(310.947,132.334) ; v1(321.462,140.179) 323.743,140.179 324.444,139.478 328.886,139.478 329.765,138.599 329.765,138.285 U1.39
R3: pad.30 U1.40 | length 33.7
  Top Layer w0.2: v1(309.06,132.591) 317.348,140.878 v1(321.435,140.878)
  Bottom Layer w0.2: pad.30 308.801,125.63 308.801,132.323 309.06,132.582 v1(309.06,132.591) ; v1(321.435,140.878) 323.663,140.878 324.663,139.878 329.052,139.878 330.165,138.765 330.165,138.451 U1.40
R4: pad.29 U1.41 | length 35.8
  Top Layer w0.2: v1(308.365,132.674) 317.269,141.577 v1(321.47,141.577)
  Bottom Layer w0.2: pad.29 307.338,128.877 308.381,129.921 308.381,132.657 v1(308.365,132.674) ; v1(321.47,141.577) 321.527,141.52 323.587,141.52 324.829,140.278 329.218,140.278 330.565,138.931 U1.41
R5: pad.28 U1.42 | length 39.8
  Top Layer w0.2: v1(305.892,132.613) 305.892,134.087 314.082,142.277 v1(321.437,142.277)
  Bottom Layer w0.2: v1(305.892,132.613) 305.938,132.568 pad.28 ; v1(321.437,142.277) 323.464,142.277 325.063,140.678 329.383,140.678 330.965,139.096 330.965,138.451 330.965,138.295 U1.42
R6: pad.27 SW16.4 U1.43 | length 91.7
  Top Layer w0.2: v1@304.546,132.393 304.546,133.306 314.217,142.977 v1(321.437,142.977) ; v1(304.579,132.393) 305.757,131.215 305.757,130.936 307.279,129.413 322.629,129.413 323.295,130.08 341.636,130.08 347.355,135.798 SW16.4
  Bottom Layer w0.2: pad.27 304.521,125.583 304.521,131.369 304.533,131.381 304.533,132.347 v1(304.579,132.393) ; v1(321.437,142.977) 323.33,142.977 325.229,141.078 329.549,141.078 331.365,139.262 331.365,138.285 U1.43
R7: pad.26 U1.44 | length 43.7
  Top Layer w0.2: v1(303.454,132.842) 303.516,132.842 314.261,143.586 321.167,143.586 v1(321.225,143.644)
  Bottom Layer w0.2: pad.26 303.149,125.578 303.149,132.456 303.454,132.761 v1(303.454,132.842) ; v1(321.225,143.644) 323.229,143.644 325.394,141.478 329.715,141.478 331.765,139.428 331.765,138.119 U1.44
"USB 5V": C9.1 D4.2 R1.1 R7.1 R12.1 U2.4 U2.8 USB5V.1 | length 92
  Top Layer w0.2: v1(302.844,133.35) 302.844,132.674 307.244,128.274 324.108,128.274 325.114,129.28 342.377,129.28 345.38,132.283 347.802,132.283 349.047,133.528 v1(349.047,136.246)
  Top Layer w0.5: v1(302.844,133.35) 302.87,133.35 v1(307.442,137.922)
  Bottom Layer w0.2: R7.1 294.953,137.719 293.734,136.5 294.334,135.9 294.334,133.17 294.815,132.69 U2.4 ; R12.1 348.767,135.966 v1(349.047,136.246)
  Bottom Layer w0.5: U2.4 C9.1@299.974,132.69 ; C9.1@299.974,132.709 300.27,132.709 300.29,132.69 301.371,132.69 USB5V.1@301.447,132.613 ; USB5V.1@301.447,132.791 302.285,132.791 v1(302.844,133.35) ; v1(307.442,137.922) 307.442,137.936 308.04,138.534 308.054,138.534 R1.1@308.19,138.671 ; R1.1 308.19,140.068 308.966,140.843 D4.2@311.959,140.843
V33: C12.1 U3.2 U11.5 | length 4.5
  Bottom Layer w0.5: U11.5 315.291,139.072 315.291,139.955 316.325,140.988 316.325,141.708 C12.1 317.65,141.808 U3.2
VDD: C2.1 C3.1 C11.2 D3.1 D4.1 H6.1 U1.34 U3.3 VDD.1 | length 67
  Top Layer w0.5: v1(319.973,137.807) 320.722,137.058 v1(322.601,137.058) 324.129,137.058 324.942,136.246 324.942,132.563 326.441,131.064 340.046,131.064 v1(340.081,131.098)
  Bottom Layer w0.2: v1(322.601,137.058) v1@322.648,137.011 ; C3.1@322.648,136.177 C3.1@322.809,136.017 ; C2.1@323.331,137.082 323.407,137.158 326.094,137.158 327.232,136.02 327.716,136.02 U1.34
  Bottom Layer w0.5: D4.1@311.867,143.356 D4.1 311.963,143.174 312.088,143.049 316.798,143.049 317.091,143.342 317.091,144.146 C11.2@317.191,144.146 ; C11.2@317.219,144.127 U3.3 318.668,141.097 319.989,139.776 319.989,137.823 v1(319.973,137.807) ; v1(322.601,137.058) C2.1@323.308,137.058 ; C3.1@322.648,136.177 v1@322.648,137.011 ; v1(340.081,131.098) 341.393,131.098 346.583,125.908 353.187,125.908 VDD.1@353.53,125.565 ; VDD.1 355.205,125.73 355.581,126.106 H6.1
VDDIO: C4.1 C5.1 U1.28 U1.33 | length 15.4
  Top Layer w0.2: v1(322.271,133.274) 322.271,134.355 324.028,136.112 v1(324.028,136.154)
  Bottom Layer w0.2: v1(322.271,133.274) C4.1 322.978,132.329 C5.1 324.891,132.309 326.203,133.62 U1.28 ; v1(324.028,136.154) 324.038,136.144 326.543,136.144 327.067,135.62 U1.33
VPP: R25.1 U1.29 VPP.1@320.726,134.544 | length 8.2
  Bottom Layer w0.2: VPP.1@320.726,134.544 320.886,134.384 323.189,134.384 323.612,133.96 R25.1 324.952,133.36 325.612,134.02 U1.29
WHA: SW16.1 U1.6 | length 29.6
  Bottom Layer w0.2: U1.6 336.762,134.82 337.659,134.82 338.529,133.95 342.51,133.95 343.726,135.166 361.128,135.166 SW16.1
WHB: SW16.2 U1.5 | length 29.4
  Bottom Layer w0.2: U1.5 337.825,135.22 338.695,134.35 342.344,134.35 343.56,135.566 361.269,135.566 362.138,136.435 SW16.2
pads on no net: SWP. SWP.3 TYPEC-16P.5 TYPEC-16P.6 TYPEC-16P.A8 TYPEC-16P.B8 U1.2 U1.4 U2.6 U11.1 U11.2 U11.3 U11.14 U11.15 U11.16

## Polygon pours and split planes (outlines as drawn)
GND on Top Layer "NONET_L02_P-001" (solid, remove dead copper, pour order 0): 285.394,149.581 364.363,149.581 364.363,120.269 363.779,119.685 285.344,119.685
GND on Bottom Layer "NONET_L02_P-001" (solid, remove dead copper, pour order 1): 286.868,149.809 363.83,149.809 364.185,149.454 364.185,120.345 286.944,120.345 286.817,120.218

## Keep-outs
Keep-Out Layer:
  circle w0.013: c342.155,125.536 r2.65
  circle w0.013: c299.155,125.536 r2.65
  circle w0.013: c343.655,139.286 r2.75
  circle w0.013: c311.155,145.036 r0.85
  lines w0.013: 288.155,123.036 ccw(c289.155,123.036) 289.155,122.036 362.155,122.036 ccw(c362.155,123.036) 363.155,123.036 363.156,145.036 ccw(c362.156,145.036) 362.156,146.036 315.175,146.036 cw(c315.175,147.036) 314.309,146.536 313.444,148.036 ccw(c312.578,147.536) 312.578,148.536 307.135,148.536 298.178,148.536 296.155,148.536 290.155,148.536 289.155,148.536 ccw(c289.155,147.536) 288.155,147.536 288.155,123.036

## Other copper
Bottom Layer:
  pour cut-out: 300.609,128.245 339.293,128.245 339.75,127.787 339.75,120.345 300.634,120.345 300.558,120.421
  pour cut-out: 337.134,146.939 337.134,140.818 351.612,140.818 352.247,141.453 352.247,143.358 364.363,143.358 364.896,143.891 364.896,146.964

## Silkscreen, mask and mechanical layers (free items; w line width, h text height)
Top Overlay:
  drawing of 207 lines, arcs and shapes, not listed
  text "BYKC-6252-K20-C" at 288.519,129.224 h1.2
  text "FR4/T=1.6MM" at 288.569,128.107 h1.2
  text "2026/09/26 HJH" at 288.493,126.989 h1.2
Bottom Overlay:
  drawing of 787 lines, arcs and shapes, not listed
  text "+" at 293.624,144.747 h2
  text "R7" at 302.819,122.504 h0.8
  text "C15" at 322.326,122.514 h0.8
  text "C16" at 315.29,122.488 h0.8
  text "C2" at 336.372,122.488 h0.8
  text "R6" at 304.292,122.463 h0.8
  text "R5" at 305.638,122.463 h0.8
  text "R4" at 306.984,122.453 h0.8
  text "R2" at 309.829,122.453 h0.8
  text "C17" at 313.817,122.462 h0.8
  text "C0" at 316.865,122.463 h0.8
  text "C10" at 320.802,122.463 h0.8
  text "C11" at 323.748,122.462 h0.8
  text "C12" at 325.12,122.462 h0.8
  text "C14" at 327.939,122.462 h0.8
  text "C7" at 329.413,122.462 h0.8
  text "C6" at 330.784,122.463 h0.8
  text "C4" at 333.578,122.462 h0.8
  text "C3" at 335.026,122.463 h0.8
  text "C1" at 337.896,122.462 h0.8
  text "R3" at 308.432,122.438 h0.8
  text "C9" at 318.186,122.438 h0.8
  text "C5" at 332.207,122.438 h0.8
  text "R1" at 311.277,122.403 h0.8
  text "R0" at 312.649,122.412 h0.8
  text "C8" at 319.583,122.412 h0.8
  text "C13" at 326.517,122.412 h0.8
Mechanical 1:
  circle w0.013: c311.155,145.036 r0.85
  circle w0.013: c342.155,125.536 r2.65
  circle w0.013: c299.155,125.536 r2.65
  circle w0.013: c343.655,139.286 r2.75
  lines w0.013: 288.155,123.036 ccw(c289.155,123.036) 289.155,122.036 362.155,122.036 ccw(c362.155,123.036) 363.155,123.036 363.156,145.036 ccw(c362.156,145.036) 362.156,146.036 315.175,146.036 cw(c315.175,147.036) 314.309,146.536 313.444,148.036 ccw(c312.578,147.536) 312.578,148.536 289.155,148.536 ccw(c289.155,147.536) 288.155,147.536 288.155,123.036

## Text inside footprints (layer, text, board x,y; h text height)
CAPS: Top Overlay "+" at 290.703,136.144 h2
NUM: Top Overlay "+" at 290.703,140.208 h2
U10: Mechanical 13 "C" at 351.765,128.359 h0.85 r270; Mechanical 13 "E" at 351.384,129.349 h0.85 r270; Mechanical 13 "B" at 351.384,127.444 h0.85 r270
WIN: Top Overlay "+" at 290.728,132.207 h2